# Altium PCB PCB1_1.pcbdoc
Units mil, origin at the board's own origin, x right, y up, seen from the top; angles counter-clockwise.
Board outline 2365 x 1975 mil, 4 copper layers (Top Layer, Signal-1, Inner2, Bottom Layer), stack 62.447 mil thick; 81 components, 55 nets, 340 pads, 136 vias.
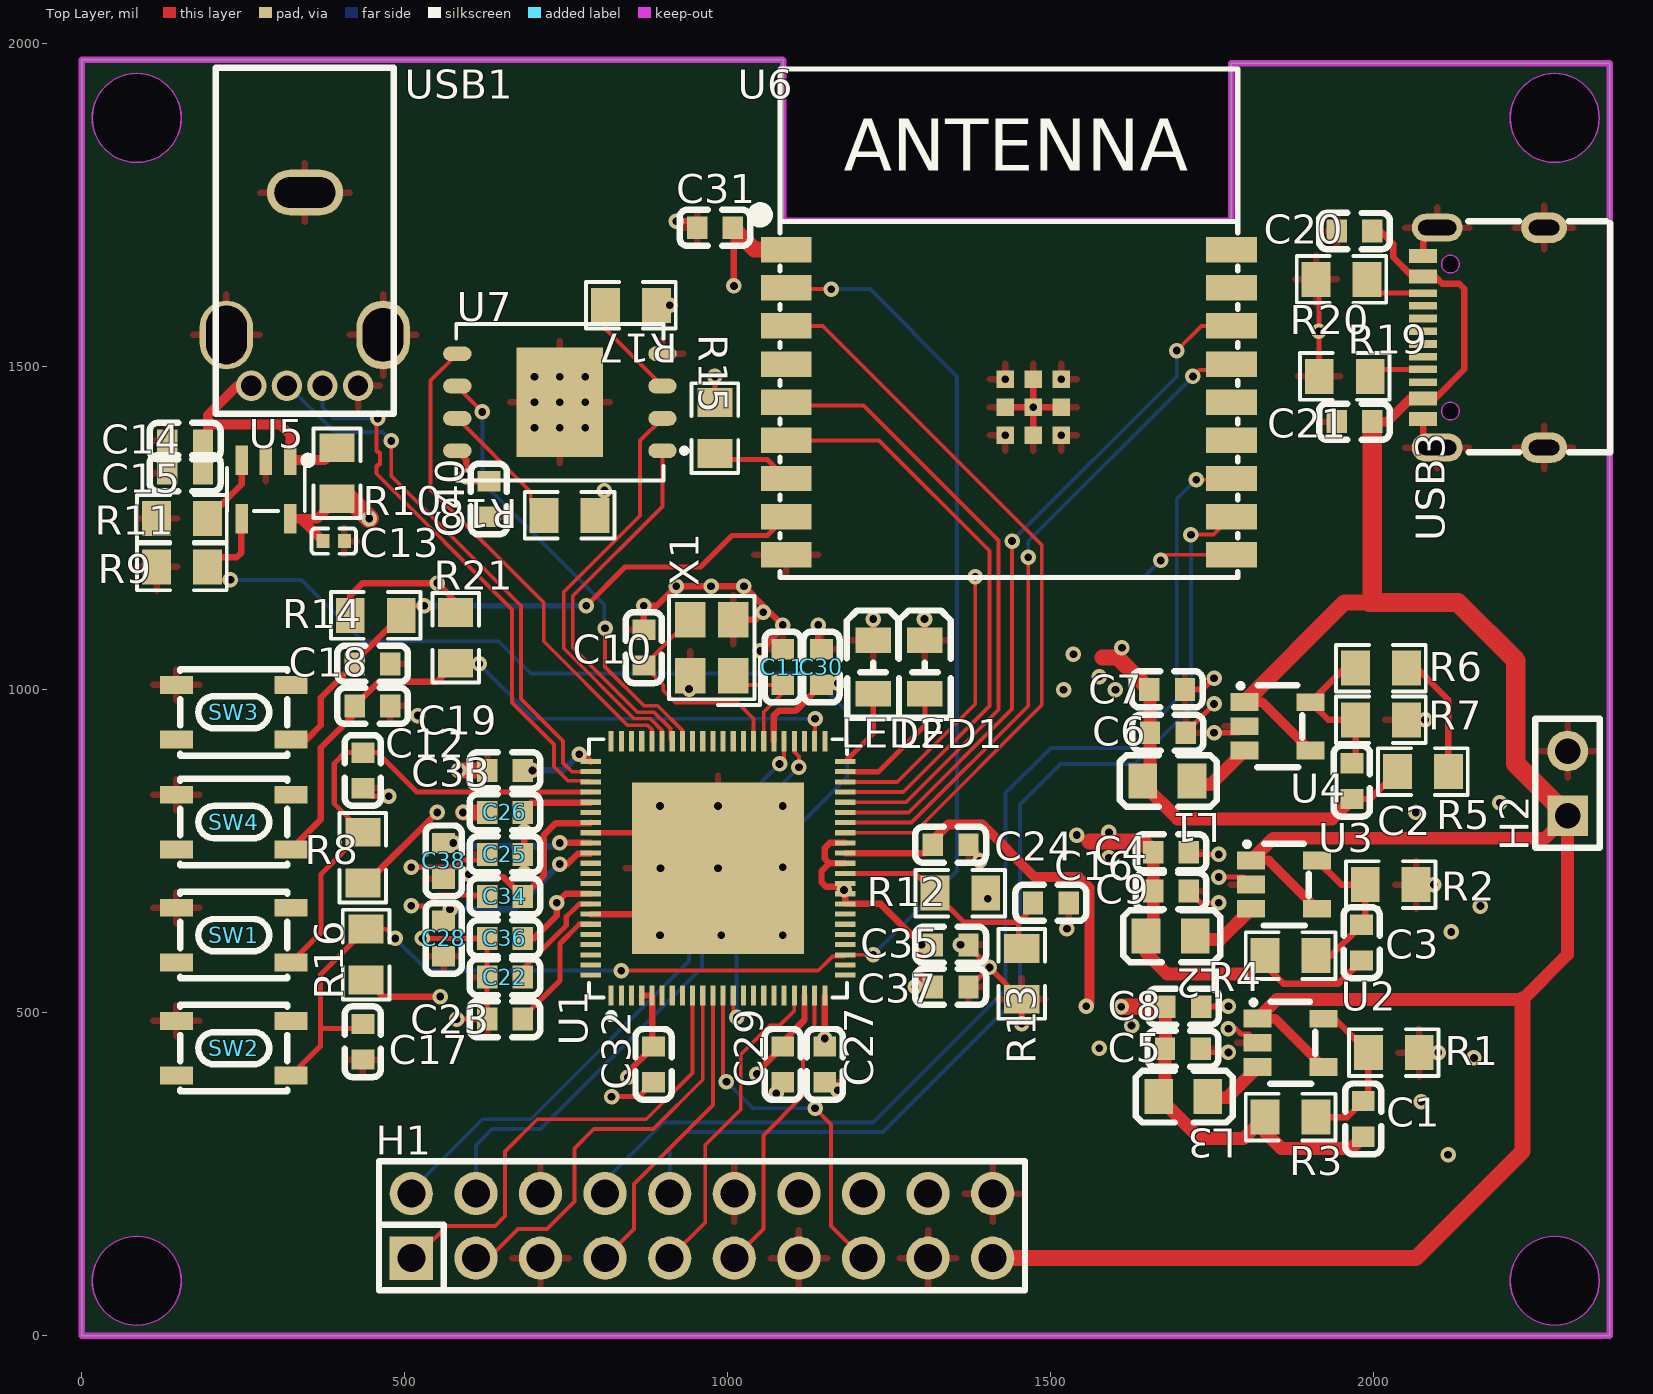
[diagram p0: Top Layer view]
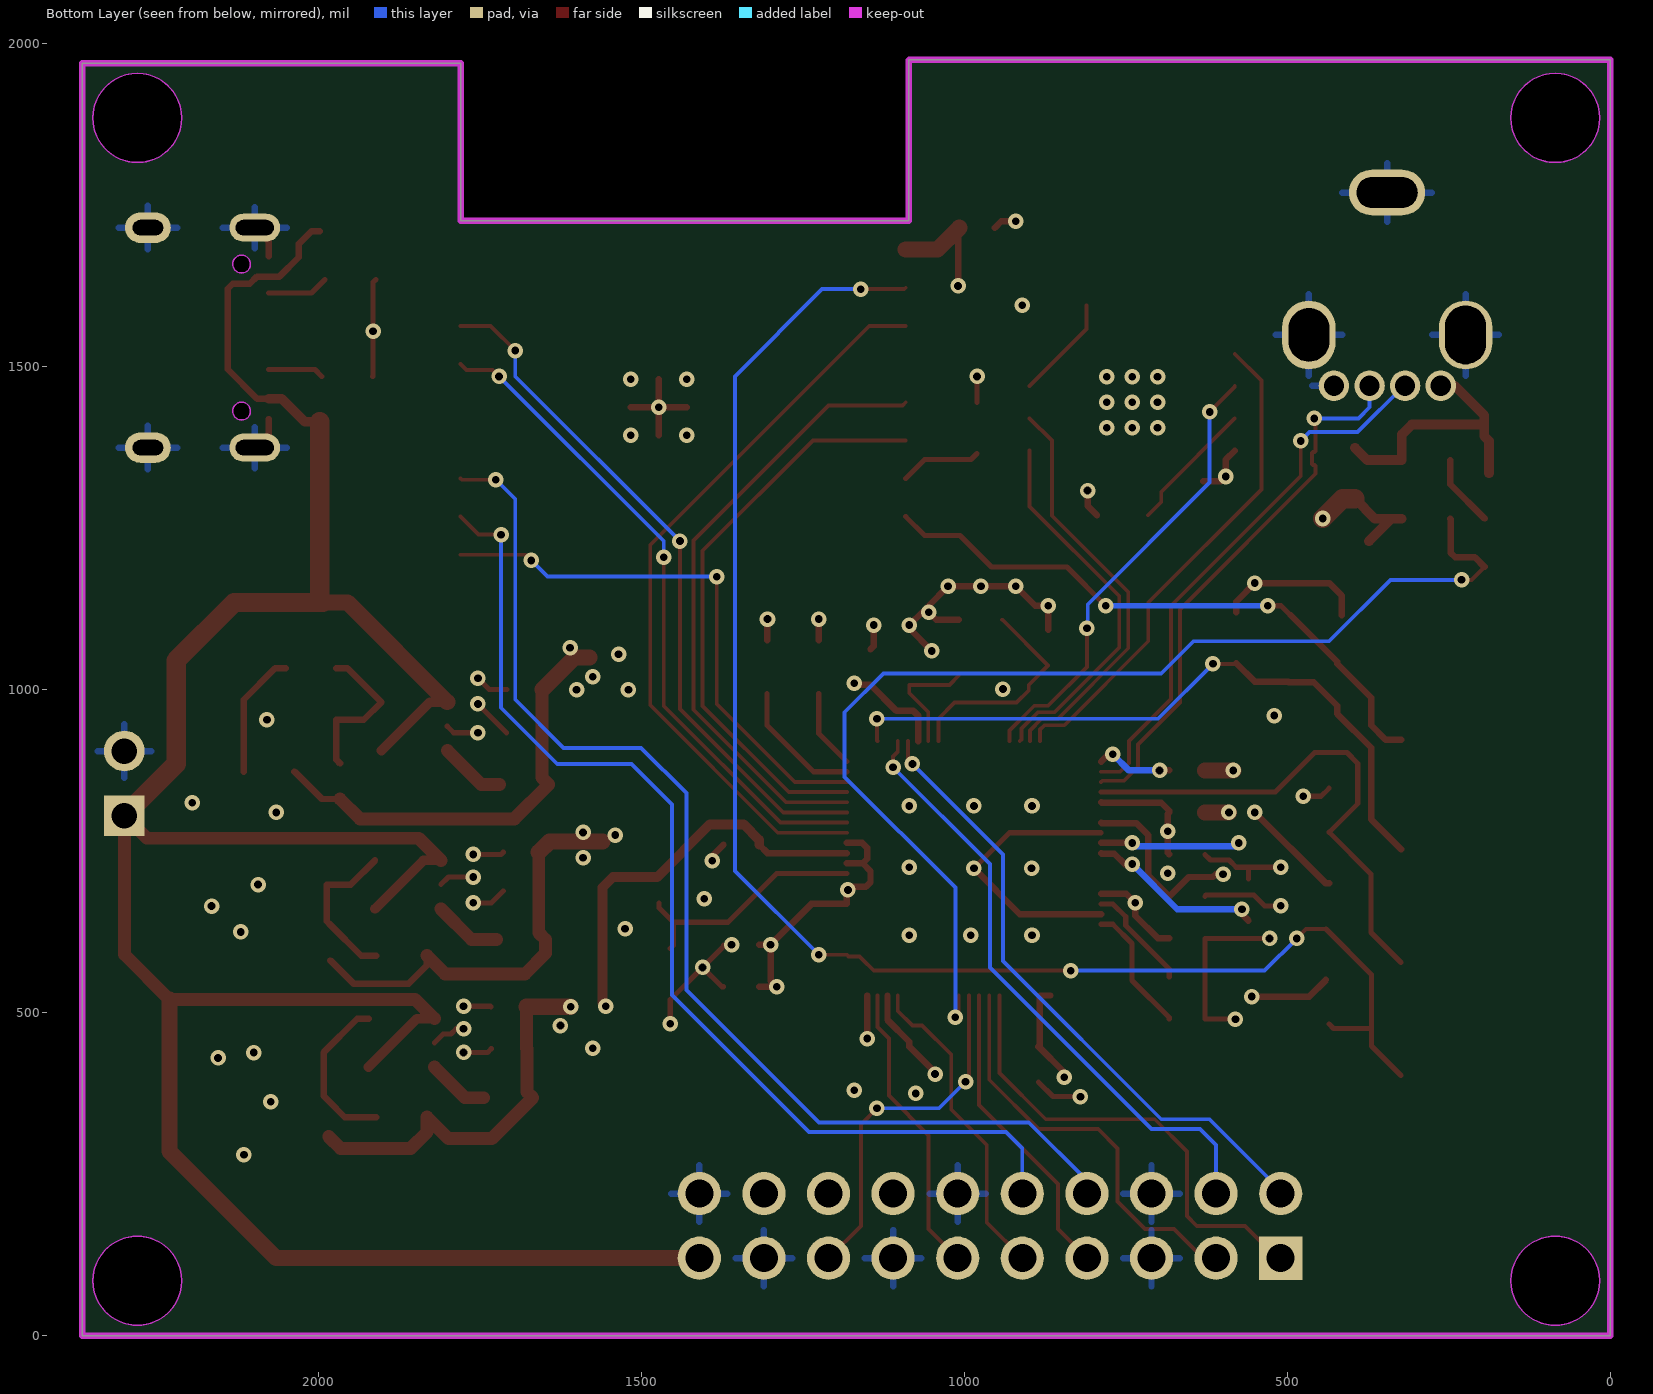
[diagram p1: Bottom Layer view, seen from below]
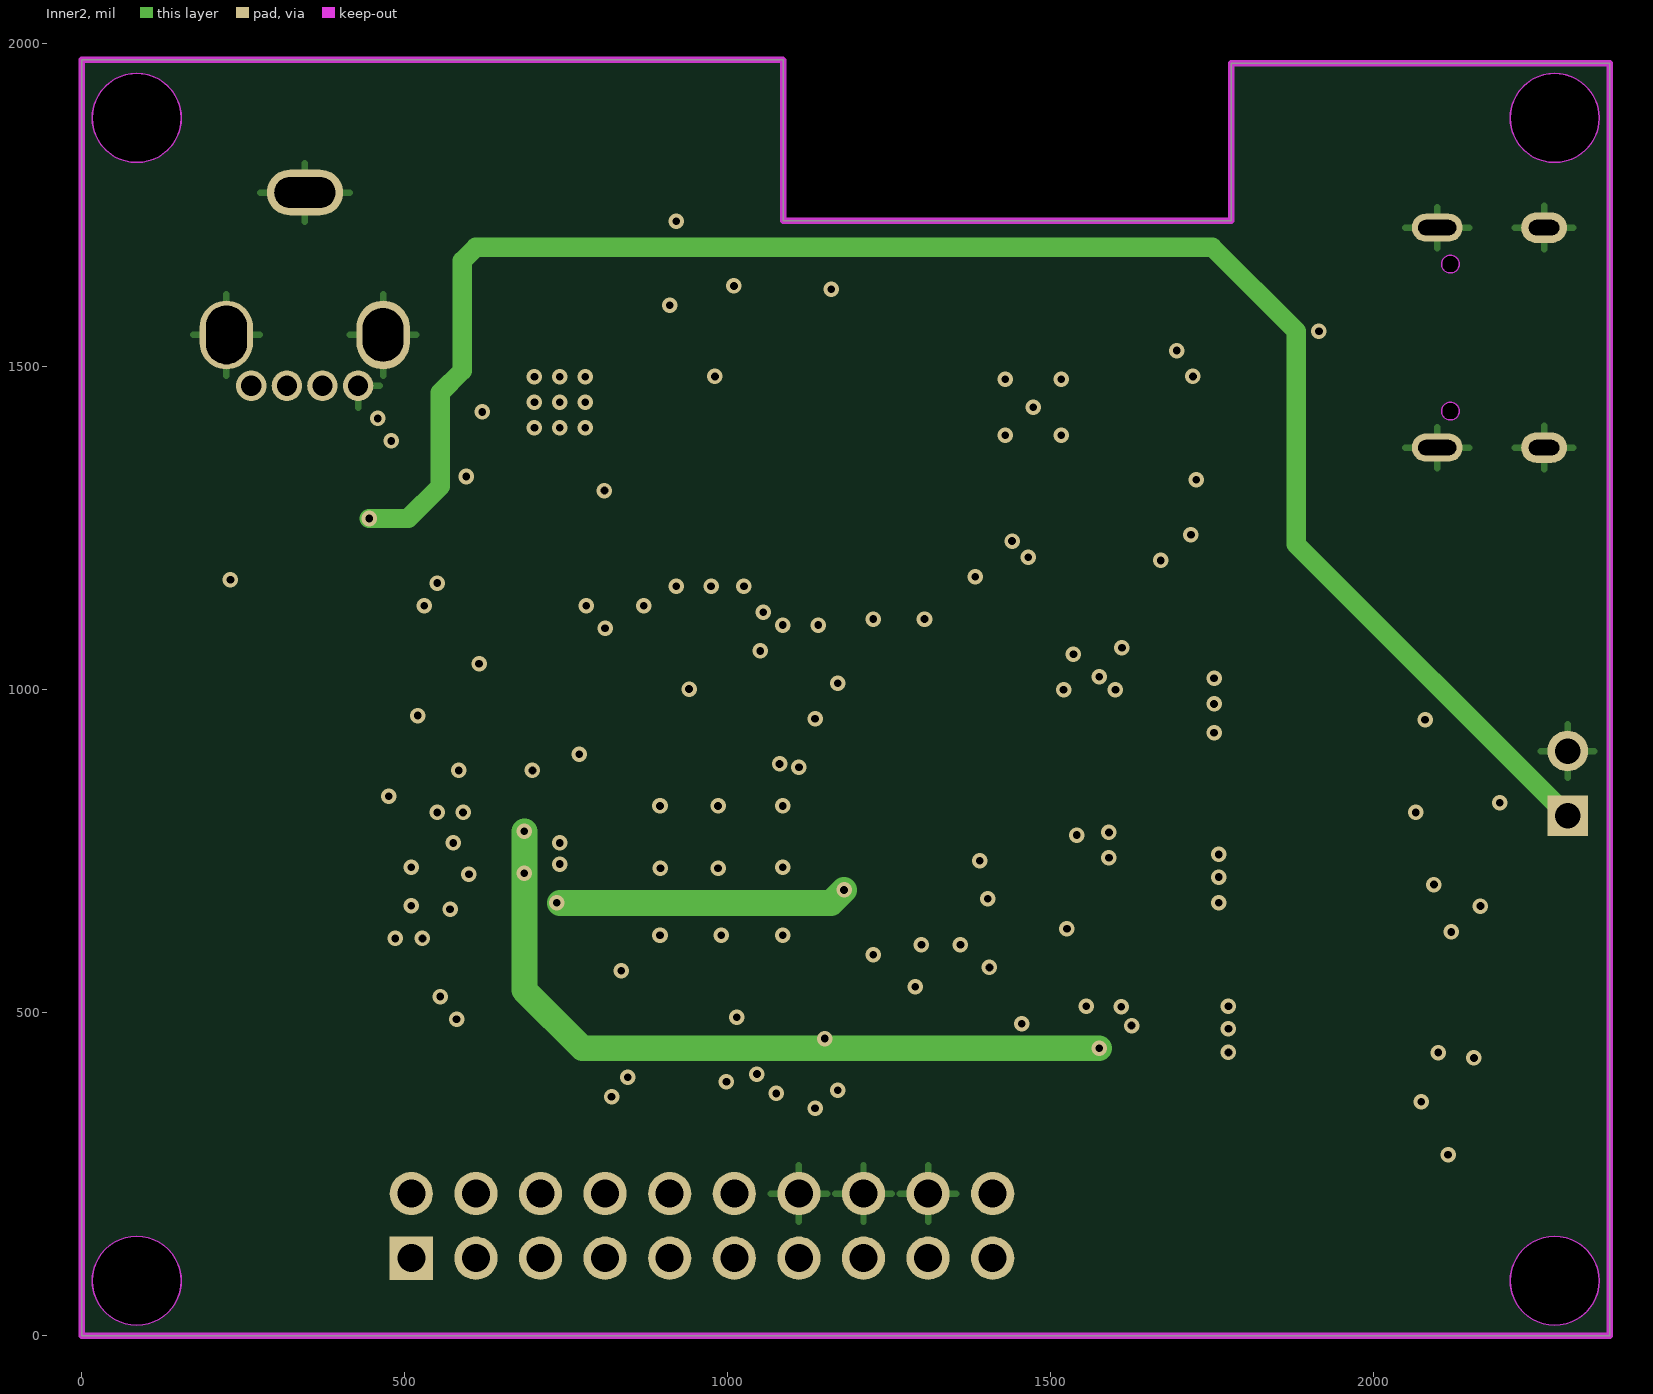
[diagram p2: Inner2]

## Layer stack, top to bottom
Top Layer: signal copper 1.378
Dielectric1: surface 8.283, 7628 RC49% 8.6mil, Dk 0
Signal-1: signal copper 0.598
Dielectric2: surface 41.929, 1.1mm H/HOZ Copper, Dk 0
Inner2: signal copper 0.598
Dielectric3: surface 8.283, 7628 RC49% 8.6mil, Dk 0
Bottom Layer: signal copper 1.378

## Board outline
0,1975 1085,1975 1085.67,1974.33 1085.67,1725.67 1779.33,1725.67 1779.33,1970 2365,1970 2365,0 0,0
cut-out: 153.9,1885 cw(c85,1885) 16.1,1885 cw(c85,1885)
cut-out: 2348.9,1885 cw(c2280,1885) 2211.1,1885 cw(c2280,1885)
cut-out: 153.9,85 cw(c85,85) 16.1,85 cw(c85,85)
cut-out: 2348.9,85 cw(c2280,85) 2211.1,85 cw(c2280,85)

## Design rules (kind name [scope] priority, off if disabled: settings)
BoardOutlineClearance copperThickness2oz_1 [All] p2 off: genericclearance=7.99 ignorepadtopadclearanceinfootprint=FALSE except(0: Arc-SplitContinuation Track-SplitContinuation SMDPad-SplitContinuation THPad-SplitContinuation Via-SplitContinuation Fill-SplitContinuation Region-SplitContinuation Poly-SplitContinuation Text-SplitContinuation Hole-SplitContinuation; 5.98: Arc-CutoutEdge SMDPad-CutoutEdge THPad-CutoutEdge Via-CutoutEdge Fill-CutoutEdge Region-CutoutEdge Text-CutoutEdge; 6.93: Hole-OutlineEdge Hole-CutoutEdge; 10: Poly-OutlineEdge Poly-CutoutEdge; 11.81: Arc-OutlineEdge Track-OutlineEdge SMDPad-OutlineEdge THPad-OutlineEdge Via-OutlineEdge Fill-OutlineEdge Region-OutlineEdge Text-OutlineEdge Track-CutoutEdge)
BoardOutlineClearance copperThickness1oz_1 [All] p4: genericclearance=4.02 ignorepadtopadclearanceinfootprint=FALSE except(0: Arc-SplitContinuation Track-SplitContinuation SMDPad-SplitContinuation THPad-SplitContinuation Via-SplitContinuation Fill-SplitContinuation Region-SplitContinuation Poly-SplitContinuation Text-SplitContinuation Hole-SplitContinuation; 5.98: SMDPad-CutoutEdge THPad-CutoutEdge Via-CutoutEdge Fill-CutoutEdge Region-CutoutEdge Text-CutoutEdge; 6.93: Hole-OutlineEdge Hole-CutoutEdge; 10: Poly-OutlineEdge Poly-CutoutEdge; 11.81: Arc-OutlineEdge Track-OutlineEdge SMDPad-OutlineEdge THPad-OutlineEdge Via-OutlineEdge Fill-OutlineEdge Region-OutlineEdge Text-OutlineEdge Arc-CutoutEdge Track-CutoutEdge)
Clearance copperThickness2oz [All] p1 off: gap=7.99 ignorepadtopadclearanceinfootprint=FALSE except(5.98: SMDPad-Track SMDPad-SMDPad THPad-Track SMDPad-THPad THPad-THPad Track-Via SMDPad-Via THPad-Via Via-Via Fill-Track Region-Track Fill-SMDPad Region-SMDPad Fill-THPad Region-THPad Fill-Via Region-Via Fill-Fill Fill-Region Region-Region Arc-Track Arc-SMDPad Arc-THPad Arc-Via Fill-Arc Region-Arc Arc-Arc Text-Track SMDPad-Text Text-THPad Text-Via Fill-Text Region-Text Arc-Text Text-Text; 6.93: Hole-Track Hole-SMDPad Hole-THPad Hole-Via Fill-Hole Region-Hole Hole-Arc Hole-Text; 10: Poly-Track Poly-SMDPad Poly-THPad Poly-Via Poly-Fill Poly-Region Poly-Poly Poly-Arc Poly-Text Poly-Hole)
Clearance copperThickness1oz [All] p3: gap=4.02 ignorepadtopadclearanceinfootprint=FALSE except(5.98: SMDPad-Track SMDPad-SMDPad THPad-Track SMDPad-THPad THPad-THPad Track-Via SMDPad-Via THPad-Via Via-Via Fill-Track Region-Track Fill-SMDPad Region-SMDPad Fill-THPad Region-THPad Fill-Via Region-Via Fill-Fill Fill-Region Region-Region Arc-Track Arc-SMDPad Arc-THPad Arc-Via Fill-Arc Region-Arc Arc-Arc Text-Track SMDPad-Text Text-THPad Text-Via Fill-Text Region-Text Arc-Text Text-Text; 6.93: Hole-Track Hole-SMDPad Hole-THPad Hole-Via Fill-Hole Region-Hole Hole-Arc Hole-Text; 10: Poly-Track Poly-SMDPad Poly-THPad Poly-Via Poly-Fill Poly-Region Poly-Poly Poly-Arc Poly-Text Poly-Hole)
DiffPairsRouting differentialPair [All] p1: maxlimit=8 minlimit=6 mostfreqgap=6 toplayer_minwidth=5 toplayer_prefwidth=6 toplayer_maxwidth=100 toplayer_mingap=8 toplayer_prefgap=8 toplayer_maxgap=8 midlayer1_minwidth=5 midlayer1_prefwidth=6 midlayer1_maxwidth=100 midlayer1_mingap=8 midlayer1_prefgap=8 midlayer1_maxgap=8 midlayer2_minwidth=5 midlayer2_prefwidth=6 midlayer2_maxwidth=100 midlayer2_mingap=8 midlayer2_prefgap=8 midlayer2_maxgap=8 bottomlayer_minwidth=5 bottomlayer_prefwidth=6 bottomlayer_maxwidth=100 bottomlayer_mingap=8 bottomlayer_prefgap=8 bottomlayer_maxgap=8 maxuncoupledlength=10
HoleToHoleClearance otherClearance [All] p1: gap=11.81 allowstackedmicrovias=TRUE
Length netLength [All] p1: minlimit=0 maxlimit=0
MatchedLengths netLengthTolerance [All] p1: tolerance=1000
PasteMaskExpansion pasteMaskExpansion [All] p1: expansion=0
PlaneConnect innerPlane [All] p1: planeconnectstyle=Relief reliefexpansion=20 reliefentries=4 reliefconductorwidth=10 reliefairgap=10
PolygonConnect copperRegion [(InNet('GND'))] p1: connectstyle=Relief reliefconductorwidth=10 reliefentries=4 polygonreliefangle="90 Angle" airgapwidth=10 via.connectstyle=Relief via.reliefconductorwidth=10 via.reliefentries=4 via.polygonreliefangle="90 Angle" via.airgapwidth=10
RoutingVias viaSize [All] p1: holewidth=12.01 width=24.02 viastyle="Through Hole" minholewidth=11.81 minwidth=19.68 maxholewidth=248.03 maxwidth=393.7
SolderMaskExpansion solderMaskExpansion [IsVia] p1: expansion=-1000 istentingtop=TRUE
SolderMaskExpansion solderMaskExpansion [All] p2: expansion=2 istentingtop=FALSE
Width copperThickness2oz_2 [All] p1 off: maxlimit=10 minlimit=10 preferedwidth=10 toplayer_minwidth=8 toplayer_maxwidth=100 toplayer_prefwidth=10 midlayer1_minwidth=8 midlayer1_maxwidth=100 midlayer1_prefwidth=10 midlayer2_minwidth=8 midlayer2_maxwidth=100 midlayer2_prefwidth=10 bottomlayer_minwidth=8 bottomlayer_maxwidth=100 bottomlayer_prefwidth=10
Width copperThickness1oz_2 [All] p2: maxlimit=10 minlimit=10 preferedwidth=10 toplayer_minwidth=5 toplayer_maxwidth=100 toplayer_prefwidth=10 midlayer1_minwidth=5 midlayer1_maxwidth=100 midlayer1_prefwidth=10 midlayer2_minwidth=5 midlayer2_maxwidth=100 midlayer2_prefwidth=10 bottomlayer_minwidth=5 bottomlayer_maxwidth=100 bottomlayer_prefwidth=10

## Components (designator, comment, footprint, x,y, rotation, side; value= is the part's Value field where it differs from the comment)
C1 "220pF" C0603 1983.64,335.62 r270 top
C2 "220pF" C0603 1966.08,858.3 r270 top
C3 "220pF" C0603 1981.08,608.3 r270 top
C4 "10uF" C0603 1686.08,748.3 r0 top
C5 "10uF" C0603 1704.41,444.21 r0 top
C6 "10uF" C0603 1681.08,933.3 r0 top
C7 "100nF" C0603 1680.16,1000.46 r180 top
C8 "100nF" C0603 1705.16,509.21 r180 top
C9 "100nF" C0603 1686.08,688.3 r180 top
C10 "22pF" C0603 870,1065 r90 top
C11 "22pF" C0603 1085,1035 r90 top
C12 "100nF" C0603 435,875 r90 top
C13 "1uF" C0402 390,1230 r180 top
C14 "10uF" C0603 160,1385 r180 top
C15 "100nF" C0603 160,1335 r180 top
C16 "100nF" C0603 1500,670 r180 top
C17 "100nF" C0603 435,455 r90 top
C18 "100nF" C0603 450,1040 r180 top
C19 "100nF" C0603 450,975 r180 top
C20 "100nF" C0603 1970,1710 r180 top
C21 "22uF" C0603 1970,1415 r180 top
C22 "1uF" C0603 655,555 r0 top
C23 "1uF" C0603 655,490 r0 top
C24 "10uF" C0603 1345,760 r180 top
C25 "100nF" C0603 655,745 r0 top
C26 "100nF" C0603 655,810 r0 top
C27 "100nF" C0603 1150,420 r90 top
C28 "10uF" C0603 560,615 r270 top
C29 "10uF" C0603 1085,420 r90 top
C30 "100nF" C0603 1145,1035 r270 top
C31 "100nF" C0603 980,1715 r0 top
C32 "100nF" C0603 885,420 r90 top
C33 "100nF" C0603 655,875 r0 top
C34 "100nF" C0603 655,680 r0 top
C35 "100nF" C0603 1345,605 r180 top
C36 "10uF" C0603 655,615 r0 top
C37 "1uF" C0603 1345,540 r180 top
C38 "10uF" C0603 560,735 r270 top
C40 "100nF" C0603 630,1295 r90 top
H1 "HX PZ2.54-2x10P ZZ" HDR-TH_20P-P2.54-V-M-R2-C10-S2.54 960,170 r0 top
H2 "LAIL-PZ2.54-2P-L" CONN-TH_LAIL-PZ2.54-2P-L 2300,855 r90 top
L1 "1.5uH" L0805 1680.4,858.68 r180 top
L2 "1.5uH" L0805 1685.4,618.37 r180 top
L3 "1.5uH" L0805 1705,370 r180 top
LED1 "GL0805UR01" LED0805-R-RD_RED 1305,1035 r270 top
LED2 "GL0805UR01" LED0805-R-RD_RED 1225,1035 r270 top
R1 "100kΩ" R0805 2031.08,438.3 r180 top
R2 "100kΩ" R0805 2026.08,698.3 r0 top
R3 "82.5kΩ" R0805 1871.08,338.3 r180 top
R4 "330kΩ" R0805 1871.08,588.3 r180 top
R5 "430kΩ" R0805 2076.08,873.3 r180 top
R6 "22kΩ" R0805 2011.08,1033.3 r0 top
R7 "100kΩ" R0805 2011.08,953.3 r0 top
R8 "3KΩ" R0805 435,740 r90 top
R9 "100kΩ" R0805 155,1190 r0 top
R10 "NC-0Ω" R0805 395,1335 r90 top
R11 "6.8kΩ" R0805 155,1265 r0 top
R12 "2kΩ" R0805 1360,685 r0 top
R13 "2kΩ" R0805 1455,560 r90 top
R14 "3KΩ" R0805 455,1115 r0 top
R15 "10kΩ" R0805 980,1405 r270 top
R16 "3KΩ" R0805 440,590 r90 top
R17 "10kΩ" R0805 850,1595 r180 top
R18 "10kΩ" R0805 755,1270 r0 top
R19 "5.1kΩ" R0805 1955,1485 r0 top
R20 "5.1kΩ" R0805 1950,1635 r0 top
R21 "3KΩ" R0805 578.71,1080.28 r270 top
SW1 "TS-KG89S-AT25F" SW-SMD_4P-L4.2-W3.3-P2.15-LS5.1 235,620 r180 top
SW2 "TS-KG89S-AT25F" SW-SMD_4P-L4.2-W3.3-P2.15-LS5.1 235,445 r180 top
SW3 "TS-KG89S-AT25F" SW-SMD_4P-L4.2-W3.3-P2.15-LS5.1 235,965 r180 top
SW4 "TS-KG89S-AT25F" SW-SMD_4P-L4.2-W3.3-P2.15-LS5.1 235,795 r180 top
U1 "F1C200S" QFN-88_L10.0-W10.0-P0.40-BL-EP6.75 984.8,723.44 r0 top
U2 "SY8089A1AAC" TSOT-23-5_L2.9-W1.6-P0.95-LS2.8-BR 1871.08,453.3 r180 top
U3 "SY8089A1AAC" TSOT-23-5_L2.9-W1.6-P0.95-LS2.8-BR 1861.08,698.3 r180 top
U4 "SY8089A1AAC" TSOT-23-5_L2.9-W1.6-P0.95-LS2.8-BR 1851.08,943.3 r180 top
U5 "SY6280AAC" SOT-23-5_L3.0-W1.7-P0.95-LS2.8-BL 285,1310 r180 top
U6 "2.4GHz" BULETM-SMD_ESPRESSIF_ESP32-C3-WROOM-02-N4-4MB 1435,1445 r0 top
U7 "W25N01GVZEIG" WSON-8_L8.0-W6.10-P1.27-TL-EP 740,1445 r180 top
USB1 "906-162A1011D10200" USB-A-TH_4P-P1.40-V-F-C39416 345,1620 r180 top
USB3 "TYPE-C 16PIN 2MD(073)" USB-C-SMD_TYPE-C-16PIN-2MD-073 2170,1545 r90 top
X1 "24MHz" CRYSTAL-SMD_4P-L3.2-W2.5-BL 975,1065 r90 top

## Footprints (in the part's own frame and the unit in brackets; to place one, negate y for a bottom-side part, rotate by r counter-clockwise, add the part's x,y. Pads: shape width x height; smd on the part's side, far side on the other; paste and mask are expansions set on the pad)
BULETM-SMD_ESPRESSIF_ESP32-C3-WROOM-02-N4-4MB [mm]
  rect 2x1 smd paste+0 mask+0.05: 1(-8.75,6) 2(-8.75,4.5) 3(-8.75,3) 4(-8.75,1.5) 5(-8.75,0) 6(-8.75,-1.5) 7(-8.75,-3) 8(-8.75,-4.5) 9(-8.75,-6) 10(8.75,-6) 11(8.75,-4.5) 12(8.75,-3) 13(8.75,-1.5) 14(8.75,0) 15(8.75,1.5) 16(8.75,3) 17(8.75,4.5) 18(8.75,6)
  rect 0.7x0.7 smd paste+0 mask+0.05: 19(-0.14,-1.3) 19(-0.14,-0.2) 19(-0.14,0.9) 19(0.96,-1.3) 19(0.96,-0.2) 19(0.96,0.9) 19(2.06,-1.3) 19(2.06,-0.2) 19(2.06,0.9)
  silkscreen extent -10.03,-6.9 9,13.1
C0402 [mm]
  rect 0.5x0.54 smd: 1(-0.42,0) 2(0.42,0)
  silkscreen extent -0.87,-0.5 0.87,0.5
C0603 [mm]
  rect 0.8x0.9 smd: 1(-0.7,0) 2(0.7,0)
  silkscreen extent -1.39,-0.71 1.39,0.71
CONN-TH_LAIL-PZ2.54-2P-L [mm]
  rect 1.6x1.6 hole 1 paste+0 mask+0.05: 1(-1.27,0)
  round 1.6 hole 1 paste+0 mask+0.05: 2(1.27,0)
  silkscreen extent -2.54,-1.27 2.54,1.27
CRYSTAL-SMD_4P-L3.2-W2.5-BL [mm]
  rect 1.4x1.2 smd: 1(-1.1,-0.85) 2(1.1,-0.85) 3(1.1,0.85) 4(-1.1,0.85)
  silkscreen extent -2.26,-1.91 2.03,1.68
HDR-TH_20P-P2.54-V-M-R2-C10-S2.54 [mm]
  rect 1.7x1.7 hole 1.1: 1(-11.43,-1.27)
  round 1.7 hole 1.1: 2(-11.43,1.27) 3(-8.89,-1.27) 4(-8.89,1.27) 5(-6.35,-1.27) 6(-6.35,1.27) 7(-3.81,-1.27) 8(-3.81,1.27) 9(-1.27,-1.27) 10(-1.27,1.27) 11(1.27,-1.27) 12(1.27,1.27) 13(3.81,-1.27) 14(3.81,1.27) 15(6.35,-1.27) 16(6.35,1.27) 17(8.89,-1.27) 18(8.89,1.27) 19(11.43,-1.27) 20(11.43,1.27)
  silkscreen extent -12.7,-2.54 12.7,2.54
L0805 [mil]
  rect 44.59x54.21 smd paste-3937.01 mask+2: 1(-38.04,0) 2(38.04,0)
  silkscreen extent -77,-40 73,40
LED0805-R-RD_RED [mm]
  rect 1x1.4 smd: 1(1.05,0) 2(-1.05,0)
  silkscreen extent -2.22,-1.04 1.99,1.01
QFN-88_L10.0-W10.0-P0.40-BL-EP6.75 [mm]
  rect 0.2x0.8 smd paste-100 mask+0.051: 1(-4.2,-5) 2(-3.8,-5) 3(-3.4,-5) 4(-3,-5) 5(-2.6,-5) 6(-2.2,-5) 7(-1.8,-5) 8(-1.4,-5) 9(-1,-5) 10(-0.6,-5) 11(-0.2,-5) 12(0.2,-5) 13(0.6,-5) 14(1,-5) 15(1.4,-5) 16(1.8,-5) 17(2.2,-5) 18(2.6,-5) 19(3,-5) 20(3.4,-5) 21(3.8,-5) 22(4.2,-5) 45(4.2,5) 46(3.8,5) 47(3.4,5) 48(3,5) 49(2.6,5) 50(2.2,5) 51(1.8,5) 52(1.4,5) 53(1,5) 54(0.6,5) 55(0.2,5) 56(-0.2,5) 57(-0.6,5) 58(-1,5) 59(-1.4,5) 60(-1.8,5) 61(-2.2,5) 62(-2.6,5) 63(-3,5) 64(-3.4,5) 65(-3.8,5) 66(-4.2,5)
  rect 0.8x0.2 smd paste-100 mask+0.051: 23(5,-4.2) 24(5,-3.8) 25(5,-3.4) 26(5,-3) 27(5,-2.6) 28(5,-2.2) 29(5,-1.8) 30(5,-1.4) 31(5,-1) 32(5,-0.6) 33(5,-0.2) 34(5,0.2) 35(5,0.6) 36(5,1) 37(5,1.4) 38(5,1.8) 39(5,2.2) 40(5,2.6) 41(5,3) 42(5,3.4) 43(5,3.8) 44(5,4.2) 67(-5,4.2) 68(-5,3.8) 69(-5,3.4) 70(-5,3) 71(-5,2.6) 72(-5,2.2) 73(-5,1.8) 74(-5,1.4) 75(-5,1) 76(-5,0.6) 77(-5,0.2) 78(-5,-0.2) 79(-5,-0.6) 80(-5,-1) 81(-5,-1.4) 82(-5,-1.8) 83(-5,-2.2) 84(-5,-2.6) 85(-5,-3) 86(-5,-3.4) 87(-5,-3.8) 88(-5,-4.2)
  rect 6.75x6.75 smd paste-100 mask+0.051: 89(0,0)
  silkscreen extent -5.08,-5.93 5.08,5.08
R0805 [mm]
  rect 1.133x1.377 smd paste-100 mask+0.051: 1(-1,0) 2(1,0)
  silkscreen extent -1.76,-0.92 1.76,0.92
SOT-23-5_L3.0-W1.7-P0.95-LS2.8-BL [mm]
  rect 0.49x1.157 smd: 1(-0.95,-1.154) 2(0,-1.154) 3(0.95,-1.154)
  rect 0.49x1.175 smd: 4(0.95,1.154) 5(-0.95,1.154)
  silkscreen extent -1.8,-1.29 1.53,0.85
SW-SMD_4P-L4.2-W3.3-P2.15-LS5.1 [mm]
  rect 1.3x0.7 smd: 1(-2.25,1.075) 2(2.25,1.075) 3(-2.25,-1.075) 4(2.25,-1.075)
  silkscreen extent -2.1,-1.7 2.1,1.7
TSOT-23-5_L2.9-W1.6-P0.95-LS2.8-BR [mm]
  rect 1.1x0.7 smd: 1(1.294,-0.951) 2(1.294,-0.001) 3(1.294,0.951) 4(-1.294,0.951) 5(-1.294,-0.949)
  silkscreen extent -0.97,-1.65 1.52,1.61
USB-A-TH_4P-P1.40-V-F-C39416 [mm]
  round 1.2 hole 0.8: 1(2.098,3.8) 2(0.698,3.8) 3(-0.699,3.8) 4(-2.098,3.8)
  oval 2.1x2.7 hole 1.6 slot 2.1 at 90 deg copper offset -0.001,0.001: 5(-3.08,1.8)
  oval 2.1x2.7 hole 1.6 slot 2.3 at 90 deg copper offset 0.001,0.001: 6(3.08,1.8)
  oval 3x1.8 hole 1.2 slot 2.4 at 0 deg: 7(-0.01,-3.8)
  silkscreen extent -3.5,-8.7 3.5,4.9
USB-C-SMD_TYPE-C-16PIN-2MD-073 [mm]
  oval 1.2x1.8 hole 0.6 slot 1.2 at 90 deg paste+0 mask+0.05: 13(-4.325,-2.375) 14(4.325,-2.375)
  oval 1.1x2 hole 0.6 slot 1.5 at 90 deg paste+0 mask+0.05: 13(-4.325,1.825) 14(4.325,1.825)
  rect 0.55x1.1 smd paste+0 mask+0.05: A1B12(-3.2,2.375) A4B9(-2.4,2.375) B1A12(3.2,2.375) B4A9(2.4,2.375)
  rect 0.3x1.1 smd paste+0 mask+0.05: A5(-1.25,2.375) A6(-0.25,2.375) A7(0.25,2.375) A8(1.25,2.375) B5(1.75,2.375) B6(0.75,2.375) B7(-0.75,2.375) B8(-1.75,2.375)
  Board Outline Layer circle w0.003: c-2.89,1.305 r0.35
  Board Outline Layer circle w0.003: c2.89,1.305 r0.35
  Board Outline Layer region: -2.89,0.955 -3.042,0.99 -3.164,1.087 -3.231,1.227 -3.231,1.383 -3.164,1.523 -3.042,1.62 -2.89,1.655 -2.89,1.655 -2.738,1.62 -2.616,1.523 -2.549,1.383 -2.549,1.227 -2.616,1.087 -2.738,0.99 -2.89,0.955
  Board Outline Layer region: -2.89,0.955 -2.968,0.964 -3.042,0.99 -3.108,1.031 -3.164,1.087 -3.205,1.153 -3.231,1.227 -3.24,1.305 -3.231,1.383 -3.205,1.457 -3.164,1.523 -3.108,1.579 -3.042,1.62 -2.968,1.646 -2.89,1.655 -2.812,1.646 -2.738,1.62 -2.672,1.579 -2.616,1.523 -2.575,1.457 -2.549,1.383 -2.54,1.305 -2.549,1.227 -2.575,1.153 -2.616,1.087 -2.672,1.031 -2.738,0.99 -2.812,0.964
  Board Outline Layer region: 2.89,0.955 2.738,0.99 2.616,1.087 2.549,1.227 2.549,1.383 2.616,1.523 2.738,1.62 2.89,1.655 2.89,1.655 3.042,1.62 3.164,1.523 3.231,1.383 3.231,1.227 3.164,1.087 3.042,0.99 2.89,0.955
  Board Outline Layer region: 2.89,0.955 2.812,0.964 2.738,0.99 2.672,1.031 2.616,1.087 2.575,1.153 2.549,1.227 2.54,1.305 2.549,1.383 2.575,1.457 2.616,1.523 2.672,1.579 2.738,1.62 2.812,1.646 2.89,1.655 2.968,1.646 3.042,1.62 3.108,1.579 3.164,1.523 3.205,1.457 3.231,1.383 3.24,1.305 3.231,1.227 3.205,1.153 3.164,1.087 3.108,1.031 3.042,0.99 2.968,0.964
  Multi-Layer board cut-out: -2.89,0.955 -3.042,0.99 -3.164,1.087 -3.231,1.227 -3.231,1.383 -3.164,1.523 -3.042,1.62 -2.89,1.655 -2.89,1.655 -2.738,1.62 -2.616,1.523 -2.549,1.383 -2.549,1.227 -2.616,1.087 -2.738,0.99 -2.89,0.955
  Multi-Layer board cut-out: 2.89,0.955 2.738,0.99 2.616,1.087 2.549,1.227 2.549,1.383 2.616,1.523 2.738,1.62 2.89,1.655 2.89,1.655 3.042,1.62 3.164,1.523 3.231,1.383 3.231,1.227 3.164,1.087 3.042,0.99 2.89,0.955
  silkscreen extent -4.5,-4.97 4.57,0.6
WSON-8_L8.0-W6.10-P1.27-TL-EP [mm]
  oval 1.115x0.581 smd: 1(-4.033,1.905) 2(-4.033,0.635) 3(-4.033,-0.635) 4(-4.033,-1.905) 5(4.033,-1.905) 6(4.033,-0.635) 7(4.033,0.635) 8(4.033,1.905)
  rect 3.4x4.3 smd: 9(0,0)
  silkscreen extent -4.99,-3.08 4.08,3.08

## Via types
v1: diameter 24, hole 12, Top Layer to Bottom Layer, 72 vias
v2: diameter 24.02, hole 12, Top Layer to Bottom Layer, 64 vias

## Nets (pads, with @x,y where several pads share a name; then routed paths per layer and width w, separated by ;. In a path a pad name is that pad's centre, name@x,y a point inside that pad or via, vN(x,y) a via of type N, cw(c..) or ccw(c..) an arc to the next point about the centre after c; other vN are vias at no path point)
1.1V: C1.2 C5.1 C8.2 C24.2 C25.2 C26.2 C27.2 L3.2 R3.2 U1.22 U1.35 U1.71 | length 2657.5
  Top Layer w10: C25.2 685,747.44 v2(685,780.96) 685,807.56 C26.2 682.56,812.56 694.97,824.97 787.12,824.97 U1.71 ; v2(1150,460) 1150,526.43 U1.22 ; U1.35 1304.5,747.06 C24.2
  Top Layer w15: C24.2 1317.44,767.44 1341.2,791.2 1393.89,791.2 1475.09,710 1543.69,710 1560,693.69 1560,515 v2(1555,510)
  Top Layer w20: C8.2 1677.6,444.96 C5.1 1676.85,377.11 1668.04,368.3 1731.34,305 1798.41,305 R3.2 1831.71,314.99 1856.7,290 1965.58,290 C1.2
  Top Layer w25: v2(1609.21,509.21) C8.2
  Inner2 w40: v2(685,780.96) v2(685,715.71) 685,535 775,445 v2(1575,445)
  other v2: 1625,480
2V5: C3.2 C4.1 C9.2 C35.2 C36.2 C37.2 L2.2 R4.2 R12.2 U1.30 U1.31 U1.32 U1.34 U1.36 U1.80 | length 1693.8
  Top Layer w10: C36.2 700,615 735,650 v2(735,670) 749.07,684.07 U1.80 ; v2(1180,690) 1175,695 1152.07,695 1145,702.07 1145,719.14 1157.16,731.31 ; U1.31 U1.30 1236.45,668.32 v2(1299.77,605) ; U1.34 1157.16,731.31 ; U1.36 1157.81,762.81 1150,755 1150,738.47 1157.16,731.31 ; C37.2 v2(1290.27,540.01) 1299.77,549.5 v2(1299.77,605) ; C35.2 v2(1299.77,605) ; R4.2 1831.71,573.29 1860,545 1945.34,545 C3.2
  Top Layer w20: C4.1 C9.2 1658.52,623.78 1648.04,613.3 1648.04,591.96 1680,560 1803.41,560 R4.2
  Top Layer w25: 1560,765 1641.82,765 C4.1
  Inner2 w40: v2@740,670 1160,670 v2(1180,690)
  other v2: 1402.32,676.34 1590,740 1540,775 1590,779.09
3V3: C2.2 C6.1 C7.2 C29.2 C30.2 C31.2 C32.2 C33.2 C34.2 C40.2 H1.14 H1.16 H1.18 L1.2 R5.2 R8.1 R14.1 R15.1 R16.1 R17.1 R18.2 R21.1 U1.4 U1.5 U1.20 U1.50 U1.67 U1.73 U6.1 U7.8 | length 2438
  Top Layer w8: R15.1 v2(980,1485)
  Top Layer w10: R14.1 415.63,1145.63 435,1165 v1(550,1165) 578.71,1136.29 R21.1 ; R8.1 440.63,700.63 v1(550,810) ; R16.1 465.63,525 v1(555,525) ; U7.8 595,1356.23 v2(595,1330) 602.44,1322.56 C40.2 ; v1(599.29,714.26) 610.74,714.26 615,710 652.56,710 C34.2 715,712.44 715,775 733.48,793.48 787.12,793.48 U1.73 ; C33.2 v2(697.53,875) ; v2(770,900) 776.74,900 U1.67 ; R18.2 808.96,1284.59 v1(808.96,1308.16) ; v2(845,400) 845,407.56 C32.2 883.27,449.29 883.27,525.76 U1.5 U1.4 ; v2(1009.4,1625) C31.2@1009.4,1713.16 ; v2(1045,405) 1045,407.56 C29.2 1085,455 1118.66,488.66 U1.20 ; U1.50 1071.41,960 1078.48,967.07 1104.63,967.07 C30.2 1167.44,1007.44 v1(1170,1010) ; C2.2 1994.15,830.74 R5.2
  Top Layer w20: C7.2@1653.52,999.54 C6.1 1653.52,863.78 1643.04,853.3 1696.34,800 1935.34,800 C2.2
  Top Layer w25: C31.2 1009.4,1713.16 1041.34,1681.22 U6.1 ; 1580,1050 1603.05,1050 C7.2
  Bottom Layer w10: v2(697.53,875) 745,875 v2(770,900)
  other v2: 1519.7,1000 1600,1000 1575,1020 1535,1055 1610,1065 910,1595
$1N25: R5.1 R6.2 | length 196.4
  Top Layer w10: R6.2 2066.7,1033.3 2115.45,984.55 R5.1
$1N102: R11.2 U5.3 | length 112.5
  Top Layer w10: R11.2 247.6,1318.23 U5.3
$1N125: R15.2 U6.7 | length 126.6
  Top Layer w8: R15.2 989.35,1356.28 1061.12,1356.28 U6.7
$1N137: R17.2 U7.3 | length 161.5
  Top Layer w6: R17.2 810.63,1558.14 U7.3
$1N141: R18.1 U7.7 | length 205.7
  Top Layer w6: U7.7 695,1306.23 695,1290.63 R18.1
$1N180: R20.2 USB3.B5 | length 95.9
  Top Layer w8: R20.2 2010.47,1613.9 USB3.B5
$1N181: R19.2 USB3.A5 | length 86.6
  Top Layer w8: R19.2 2005.16,1495.8 USB3.A5
+5V: C13.2 C20.1 C21.1 H1.19 H2.1 R10.1 U2.1 U2.4 U3.1 U3.4 U4.1 U4.4 U5.5 USB3.A4B9 USB3.B4A9 | length 7313.9
  Top Layer w10: C20.1 2010,1710 2030,1690 2030,1669.47 2059.97,1639.49 USB3.B4A9 2094.65,1639.49 2105.95,1628.19 2132.27,1628.19 2140,1620.47 2140,1495.86 2094.65,1450.52 USB3.A4B9
  Top Layer w15: U5.5 338.88,1264.58 ; C13.2 338.88,1264.58 ; R10.1 363.95,1264.58 338.88,1264.58 ; U4.1 1827.14,980.74 U4.4 ; U3.1 1837.14,735.74 U3.4 ; U2.1 1847.14,490.74 U2.4 ; C21.1 2020.93,1415 2056.44,1450.52 USB3.A4B9
  Top Layer w20: U3.1 1844.39,770 2265,770 H2.1 2300,590 2230.43,520.43 1849.82,520.43 U2.1
  Top Layer w25: H1.19 2065,120 2230.43,285.43 2230.43,520.43 ; U4.1 1954.39,1135 1992.56,1135
  Top Layer w30: R10.1 414.37,1295.63 v2(445,1265) ; C21.1 1997.56,1140 1992.56,1135 2130,1135 2220,1045 2220,885 H2.1
  Inner2 w30: v2(445,1265) 505,1265 555,1315 555,1460 588.79,1493.79 588.79,1663.79 610,1685 1750,1685 1880,1555 1880,1225 H2.1
ESP_UART_RX: H1.10 U6.11 | length 1674.3
  Top Layer w6: v2(1716.98,1240) 1751.65,1240 U6.11
  Bottom Layer w6: H1.10 910,290 935,315 1240,315 1452.5,527.5 1452.5,822.5 1515,885 1630,885 1716.98,971.98 v2(1716.98,1240)
ESP_UART_TX: H1.8 U6.12 | length 1800
  Top Layer w6: v2(1725,1325) 1777.6,1325 U6.12
  Bottom Layer w6: H1.8 810,240 900,330 1225,330 1430,535 1430,840 1500,910 1620,910 1695,985 1695,1295 v2(1725,1325)
F4BOOT: H1.15 U1.12 | length 552.9
  Top Layer w6: U1.12 992.67,398.24 v2(997.93,392.99) ; v2(1135,351.98) 1160,326.98 1160,170 H1.15
  Bottom Layer w6: v2(997.93,392.99) 1038.93,351.98 v2(1135,351.98)
F4RESET: H1.7 U1.11 | length 475.7
  Top Layer w6: H1.7 855,165 855,235 976.93,356.93 U1.11
FB1: C1.1 R1.2 R3.1 U2.5 | length 253.3
  Top Layer w10: R3.1 1958.76,338.3 C1.1 1991.71,371.25 R1.2 1939.35,490.66 U2.5
FB2: C3.1 R2.1 R4.1 U3.5 | length 245.3
  Top Layer w10: R4.1 1933.52,588.3 C3.1 1986.71,641.49 R2.1 1949.39,698.3 U3.5
FB3: C2.1 R6.1 R7.1 U4.5 | length 242.3
  Top Layer w10: C2.1 1971.71,891.49 R7.1 1929.39,953.3 U4.5 1954.66,1033.3 R6.1
GND: C4.2 C5.2 C6.2 C7.1 C8.1 C9.1 C10.2 C11.2 C12.1 C13.1 C14.2 C15.2 C16.1 C17.1 C18.1 C19.1 C20.2 C21.2 C22.1 C23.1 C24.1 C25.1 C26.1 C27.1 C28.2 C29.1 C30.1 C31.1 C32.1 C33.1 C34.1 C35.1 C36.1 C37.1 C38.2 C40.1 H1.5 H1.6 H1.12 H1.13 H1.17 H1.20 H2.2 LED1.2 LED2.2 R1.1 R2.2 R7.2 R9.1 R11.1 R13.1 R19.1 R20.1 SW1.4 SW2.4 SW3.4 SW4.4 U1.74 U1.82 U1.89 U2.2 U3.2 U4.2 U5.2 U6.9 U6.19 U7.4 U7.9 USB1.4 USB1.5 USB1.6 USB1.7 USB3.13 USB3.14 USB3.A1B12 USB3.B1A12 X1.2 X1.4 | length 2862.6
  Top Layer w8: C12.1 447.44,835 v1(475,835) ; v1(510,665.37) 535.23,665.37 551.85,681.99 625.45,681.99 C34.1 ; v1(510,725) 558.67,725 ; v1(527.17,615) C36.1 C22.1 C23.1 v1(580,490) ; C38.2 560,723.67 558.67,725 ; C25.1 618.68,736.24 590.19,736.24 578.95,725 558.67,725 ; U1.74 929.68,778.56 v2(984.8,723.44) ; v1(820,370) 862.56,370 C32.1 ; C37.1 1375,540 v1(1405,570) ; C35.1 1372.56,602.44 v1(1405,570) ; v1(1455,482.98) R13.1 1454.37,520.63 v1(1405,570) ; C7.1 1735.27,1000.46 v1(1752.66,1017.84) ; C6.2 1752.66,977.32 v1(1752.66,977.94) ; C9.1 1731.93,670.01 v1(1760,670.01) ; C4.2 1716.94,745 v1(1760,745) ; C5.2 1737.65,438.52 v1(1775,438.52) ; C8.1 1733.51,510 v1(1775,510) ; v1(1752.66,933.3) 1790.09,933.3 U4.2 ; v1(1760,710) 1798.48,710 U3.2 ; v1(1775,475) 1786.32,475 1794.34,466.98 1806.5,466.98 U2.2 ; R20.1 1915,1630.63 v1(1915,1555) 1915,1485.63 R19.1
  Top Layer w10: U1.82 913.93,652.57 v2(984.8,723.44) ; C10.2 v1(870,1130) 890,1130 v1(920,1160) v1(974.08,1160) v1(1025,1160) 1055,1130 v1(1055,1120) ; v1(920,1725) 942.44,1725 C31.1 ; X1.2 1043.31,1108.31 v1(1055,1120) ; v1(1050,1060) 1085,1095 v1(1085,1100) 1065,1120 v1(1055,1120) ; v1(1140,1100) 1140,1067.56 C30.1 ; LED2.2 v1(1224.95,1109.31) ; v1(1304.45,1109.31) 1305,1108.76 LED1.2 ; C24.1 1390,742.56 v1(1390,735) ; U6.19@1429.49,1437.13 v1(1472.79,1437.13) ; U6.19@1472.79,1393.82 v1(1472.79,1437.13) ; U6.19@1472.79,1480.44 v1(1472.79,1437.13) ; U6.19@1516.1,1437.13 v1(1472.79,1437.13) ; USB3.A1B12 2076.49,1396.38 USB3.13@2098.15,1374.73 ; USB3.B1A12 2076.49,1693.62 USB3.14@2098.15,1715.27
  Top Layer w25: v1(583.57,875) C33.1 ; v1(590.21,810) C26.1
  other v1: 2115,280 2073.4,362.24 1075,375 1170,380 2155,430 2099.89,438.3 1360,605 2120,625 1525,630 2165,665 2093.01,698.3 2065,810 2195,825 2079.43,953.3 520,960 940,1000.98 1429.49,1393.82 1516.1,1393.82 700.63,1405.63 740,1405.63 779.37,1405.63 700.63,1445 740,1445 779.37,1445 1429.49,1480.44 1516.1,1480.44 700.63,1484.37 740,1484.37 779.37,1484.37
  other v2: 895,620 990,620 1085,620 895.75,723.44 1085,725 895,820 984.8,820 1085,820
HOSCI: C11.1 U1.51 X1.1 | length 181.7
  Top Layer w6: X1.1 1022.72,1007.44 C11.1 1085,995 1055.67,965.67 U1.51
HOSCO: C10.1 U1.52 X1.3 | length 344.7
  Top Layer w6: X1.3 940.87,1108.31 C10.1 900,1007.44 900,998.95 918.95,980 1015,980 1039.92,955.08 U1.52
KEY_USER: C19.2 R21.2 SW4.1 U1.46 | length 1073.7
  Top Layer w6: R21.2 579.62,1040 v2(615,1040) ; U1.46 1135,920.87 v2(1135,955)
  Top Layer w10: SW4.1 370,799.09 370,910 422.44,962.44 C19.2 458.74,1011.3 497.86,1011.3 498.63,1012.07 549.87,1012.07 R21.2
  Bottom Layer w6: v2(615,1040) 700,955 v2(1135,955)
LED_ERR: LED2.1 U1.44 | length 122.8
  Top Layer w8: U1.44 1225,932.13 LED2.1
LED_RUN: LED1.1 U1.43 | length 201.8
  Top Layer w8: U1.43 1233.05,873.05 1305,945 LED1.1
LINUX_UART_RX: H1.2 U1.49 | length 983.3
  Top Layer w6: v2(1080,885) 1087.16,892.16 U1.49
  Bottom Layer w6: H1.2 510,225 620,335 695,335 940,580 940,745 v2(1080,885)
LINUX_UART_TX: H1.4 U1.48 | length 954.3
  Top Layer w6: U1.48 1102.91,903.65 1110,896.56 v2(1110,880)
  Bottom Layer w6: H1.4 610,295 635,320 710,320 960,570 960,730 v2(1110,880)
LX1: L3.1 U2.3 | length 95.7
  Top Layer w20: L3.1@1744.12,368.3 1772.57,368.3 U2.3
LX2: L2.1 U3.3 | length 105.7
  Top Layer w20: L2.1@1724.12,613.3 1762.57,613.3 U3.3
LX3: L1.1 U4.3 | length 102.8
  Top Layer w20: L1.1@1719.12,853.3 1747.57,853.3 U4.3
RESET: C12.2 R8.2 SW1.1 U1.70 | length 802
  Top Layer w8: SW1.1 370,624.09 370,714.37 434.97,779.34 390.75,823.56 390.75,885.75 407.56,902.56 C12.2 457.44,902.56 518.45,841.55 U1.70
SPI0_CS: U1.60 U7.1 | length 586.1
  Top Layer w6: U7.1 898.77,1283.77 760,1145 760,1065 859.95,965.05 885.82,965.05 911.11,939.76 911.11,923.1 U1.60
SPI0_MISO: U1.61 U7.2 | length 640.8
  Top Layer w6: U1.61 898.19,936.93 880.08,955.04 855.01,954.99 745.95,1064.05 745.95,1150.95 864.24,1269.24 864.24,1385.47 U7.2
SPI0_MOSI: U1.62 U7.5 | length 776.8
  Top Layer w6: U7.5 540,1478.77 540,1310 715,1135 715,1075 844.98,945.02 875.94,945.02 882.44,938.51 U1.62
SPI0_SCK: U1.59 U7.6 | length 706.7
  Top Layer w6: U7.6 581.23,1468.77 v2(620,1430) ; v2(810,1095) 810,1035 869.93,975.07 891.54,975.07 929.68,936.93 U1.59
  Bottom Layer w6: v2(620,1430) 620,1320.68 808.7,1131.98 808.7,1096.3 v2(810,1095)
SVREF: C16.2 R12.1 R13.2 U1.33 | length 381.6
  Top Layer w8: U1.33 1290.06,715.57 R12.1 1365.63,640 1450,640 ; R13.2 1450,604.37 1450,640 ; C16.2 1472.44,662.44 1450,640
TV_VRN: C38.1 U1.75 | length 219.8
  Top Layer w10: v2(740,762.81) U1.75
  Bottom Layer w10: v2(575,762.81) 579.83,757.97 740,757.97 v2(740,762.81)
TV_VRP: C28.1 U1.76 | length 275.6
  Top Layer w10: C28.1 570,652.56 v2(570,660) ; v2(740,730) 751.43,730 767.66,746.23 787.12,746.23 U1.76
  Bottom Layer w10: v2(570,660) 670,660 v2(740,730)
UART1_RX: H1.1 U1.9 | length 732.7
  Top Layer w6: H1.1 515,120 565,170 640,170 655,185 655,285 705,335 873.73,335 945.43,406.7 U1.9
UART1_TX: H1.3 U1.10 | length 644.3
  Top Layer w6: H1.3 630,120 675,165 720,165 762.5,207.5 762.5,290 792.5,320 885,320 961.18,396.18 U1.10
UART2_RX: H1.11 U1.21 | length 458.1
  Top Layer w6: H1.11 1055,165 1055,310 1116.54,371.54 1116.54,460.27 1134.24,477.97 1134.24,526.42 U1.21
UART2_TX: H1.9 U1.19 | length 495.3
  Top Layer w6: H1.9 965,175 965,295 1020,350 1020,435 1065,480 1080,480 1102.91,502.91 U1.19
USB-5V: C14.1 C15.1 R10.2 U5.1 USB1.1 | length 433.1
  Top Layer w15: C15.1 C14.1 195,1392.44 195,1410.38 ; USB1.1 240.4,1470.4 195,1425 195,1410.38 ; R10.2 376.05,1355.42 U5.1 322.4,1395 307.02,1410.38 195,1410.38
USB-DM: U1.68 USB1.2 | length 854.1
  Top Layer w6: v2(478.98,1385) 478.98,1331.02 680,1130 680,985.8 745,920.8 745,886.5 758.45,873.05 U1.68
  Bottom Layer w6: USB1.2 319.47,1470.4 391.03,1398.84 465.14,1398.84 v2(478.98,1385)
USB-DP: U1.69 USB1.3 | length 853.1
  Top Layer w6: v2(458.06,1419.84) 456,1417.77 456,1370.73 ccw(c458.89,1370.73) 458.89,1367.84 cw(c458.89,1364.95) 461.78,1364.95 461.78,1350.73 cw(c458.89,1350.73) 458.89,1347.84 ccw(c458.89,1344.95) 456,1344.95 456,1334.2 666,1124.2 666,980 731,915 731,880.7 752.66,859.05 786.2,859.05 U1.69
  Bottom Layer w6: USB1.3 372.5,1437.17 389.84,1419.84 v2(458.06,1419.84)
USB-EN: R9.2 U1.13 U5.4 | length 1779
  Top Layer w6: R9.2 214.37,1170 v1(230,1170) ; U1.13 1008.42,496.58 1012.31,492.69 v1@1012.31,490.71
  Top Layer w10: R9.2 209.37,1205 240,1205 247.07,1212.07 247.07,1264.05 U5.4
  Bottom Layer w6: v1(230,1170) 340,1170 435,1075 645,1075 695,1025 1125,1025 1185,965 1185,865 1013.66,693.66 v1(1013.66,492.85)
VRA1: C22.2 U1.81 | length 167.5
  Top Layer w8: C22.2 682.56,567.42 750,634.86 750,648.42 769.9,668.32 U1.81
VRA2: C23.2 U1.83 | length 201.1
  Top Layer w8: C23.2 682.56,492.56 740,550 740,606.93 769.9,636.83 U1.83
WIFI-BOOT: C18.2 R14.2 SW3.1 U6.8 | length 936.6
  Top Layer w8: R14.2 509.37,1130 v2(530,1130) ; v2(780.99,1130) 840.99,1190 957.92,1190 1006.37,1238.45 1061.12,1238.45 U6.8
  Top Layer w10: SW3.1 347.68,922.68 370,945 370,987.56 C18.2 422.44,1043.07 R14.2
  Bottom Layer w8: v2(530,1130) v2(780.99,1130)
WIFI-RESET: C17.2 R16.2 SW2.1 U1.25 U6.2 | length 2435.9
  Top Layer w6: R16.2 470.63,629.37 v2(485,615) ; v2(835,565) 1140,565 1150.09,575.09 1150.53,575.09 1162.18,586.75 1178.82,586.75 U1.25 v1(1225,589.58) ; U6.2 1092.68,1620 v1(1160,1620)
  Top Layer w8: SW2.1 369.34,448.44 369.34,475.65 ; C17.2 428.09,475.65 369.34,475.65 ; R16.2 369.34,558.71 369.34,475.65
  Bottom Layer w6: v2(485,615) 535,565 v2(835,565) ; v1(1160,1620) 1220,1620 1355,1485 1355,719.58 v1(1225,589.58)
WIFI_DATA: U1.37 U6.3 | length 1170.1
  Top Layer w6: U6.3 1146.89,1563.11 1485.99,1224.01 1485.99,975.99 1288.56,778.56 U1.37
WIFI_HANDSHAKE: U1.38 U6.15 | length 1041.2
  Top Layer w6: U1.38 1284.31,794.31 1465,975 v2(1465,1205) ; v2(1720,1485) 1730,1495 1770.43,1495 U6.15
  Bottom Layer w6: v2(1465,1205) 1465,1230 v2(1720,1485)
WIFI_SPI_CS: U1.42 U6.10 | length 858.8
  Top Layer w6: U1.42 1262.3,857.3 1383.02,978.02 v2(1383.02,1175) ; v2(1670,1200) 1678.78,1208.78 U6.10
  Bottom Layer w6: v2(1383.02,1175) 1645,1175 v2(1670,1200)
WIFI_SPI_MISO: U1.39 U6.16 | length 1085.5
  Top Layer w6: U1.39 1280.05,810.05 1440,970 v2(1440,1230) ; v2(1695,1525) 1733.11,1563.11 U6.16
  Bottom Layer w6: v2(1440,1230) 1695,1485 v2(1695,1525)
WIFI_SPI_MOSI: U1.41 U6.6 | length 903.9
  Top Layer w6: U6.6 1234.05,1385.95 1405,1215 1405,975 1271.55,841.55 U1.41
WIFI_SPI_SCK: U1.40 U6.5 | length 975.8
  Top Layer w6: U6.5 1095.51,1440 1210,1440 1419,1231 1419,969 1275.8,825.8 U1.40
pads on no net: SW1.2 SW1.3 SW2.2 SW2.3 SW3.2 SW3.3 SW4.2 SW4.3 U1.1 U1.2 U1.3 U1.6 U1.7 U1.8 U1.14 U1.15 U1.16 U1.17 U1.18 U1.23 U1.24 U1.26 U1.27 U1.28 U1.29 U1.45 U1.47 U1.53 U1.54 U1.55 U1.56 U1.57 U1.58 U1.63 U1.64 U1.65 U1.66 U1.72 U1.77 U1.78 U1.79 U1.84 U1.85 U1.86 U1.87 U1.88 U6.4 U6.13 U6.14 U6.17 U6.18 USB3.A6 USB3.A7 USB3.A8 USB3.B6 USB3.B7 USB3.B8

## Polygon pours and split planes (outlines as drawn)
3V3 on Top Layer (solid, remove dead copper, pour order 4): 1500,1085 1500,976.09 1629,976.09 1629,1085
1.1V on Top Layer (solid, remove dead copper, pour order 6): 1525,535 1525,428.47 1649.69,428.47 1649.69,535
2V5 on Inner2 (solid, remove dead copper): 1615,800 1615,640 1487.04,512.04 1292.96,512.04 1284.63,510.84 1154.09,510.84 1154.09,723.4 1515.22,719.8 1512.54,800
GND on Inner2 (solid, remove dead copper): -125,2130 -125,-50 2445,-50 2445,2130
1.1V on Inner2 (solid, remove dead copper): 1525,535 1525,428.47 1649.69,428.47 1649.69,535
2V5 on Top Layer (solid, remove dead copper, pour order 2): 1510,810 1510,725 1615,725 1615,810
3V3 on Inner2 (solid, remove dead copper): 540,1640 540,61.04 1668.82,61.04 1668.82,1640
GND on Bottom Layer (solid, remove dead copper, pour order 18): -330,2110 -330,-135 2755,-135 2755,2110
GND on Top Layer (solid, remove dead copper, pour order 8): -235,2045 -235,-135 2700,-135 2700,2045

## Keep-outs
Board Outline Layer:
  region: 153.9,1885 cw(c85,1885) 16.1,1885 cw(c85,1885)
  circle w0.1: c85,1885 r68.9
  region: 153.9,1885 153.52,1877.8 152.39,1870.68 150.53,1863.71 147.94,1856.98 144.67,1850.55 140.74,1844.5 136.2,1838.9 131.1,1833.8 125.5,1829.26 119.45,1825.33 113.02,1822.06 106.29,1819.47 99.32,1817.61 92.2,1816.48 85,1816.1 77.8,1816.48 70.68,1817.61 63.71,1819.47 56.98,1822.06 50.55,1825.33 44.5,1829.26 38.9,1833.8 33.8,1838.9 29.26,1844.5 25.33,1850.55 22.06,1856.98 19.47,1863.71 17.61,1870.68 16.48,1877.8 16.1,1885 16.48,1892.2 17.61,1899.32 19.47,1906.29 22.06,1913.02 25.33,1919.45 29.26,1925.5 33.8,1931.1 38.9,1936.2 44.5,1940.74 50.55,1944.67 56.98,1947.94 63.71,1950.53 70.68,1952.39 77.8,1953.52 85,1953.9 92.2,1953.52 99.32,1952.39 106.29,1950.53 113.02,1947.94 119.45,1944.67 125.5,1940.74 131.1,1936.2 136.2,1931.1 140.74,1925.5 144.67,1919.45 147.94,1913.02 150.53,1906.29 152.39,1899.32 153.52,1892.2
  region: 2348.9,1885 cw(c2280,1885) 2211.1,1885 cw(c2280,1885)
  circle w0.1: c2280,1885 r68.9
  region: 2348.9,1885 2348.52,1877.8 2347.39,1870.68 2345.53,1863.71 2342.94,1856.98 2339.67,1850.55 2335.74,1844.5 2331.2,1838.9 2326.1,1833.8 2320.5,1829.26 2314.45,1825.33 2308.02,1822.06 2301.29,1819.47 2294.32,1817.61 2287.2,1816.48 2280,1816.1 2272.8,1816.48 2265.68,1817.61 2258.71,1819.47 2251.98,1822.06 2245.55,1825.33 2239.5,1829.26 2233.9,1833.8 2228.8,1838.9 2224.26,1844.5 2220.33,1850.55 2217.06,1856.98 2214.47,1863.71 2212.61,1870.68 2211.48,1877.8 2211.1,1885 2211.48,1892.2 2212.61,1899.32 2214.47,1906.29 2217.06,1913.02 2220.33,1919.45 2224.26,1925.5 2228.8,1931.1 2233.9,1936.2 2239.5,1940.74 2245.55,1944.67 2251.98,1947.94 2258.71,1950.53 2265.68,1952.39 2272.8,1953.52 2280,1953.9 2287.2,1953.52 2294.32,1952.39 2301.29,1950.53 2308.02,1947.94 2314.45,1944.67 2320.5,1940.74 2326.1,1936.2 2331.2,1931.1 2335.74,1925.5 2339.67,1919.45 2342.94,1913.02 2345.53,1906.29 2347.39,1899.32 2348.52,1892.2
  region: 153.9,85 cw(c85,85) 16.1,85 cw(c85,85)
  circle w0.1: c85,85 r68.9
  region: 153.9,85 153.52,77.8 152.39,70.68 150.53,63.71 147.94,56.98 144.67,50.55 140.74,44.5 136.2,38.9 131.1,33.8 125.5,29.26 119.45,25.33 113.02,22.06 106.29,19.47 99.32,17.61 92.2,16.48 85,16.1 77.8,16.48 70.68,17.61 63.71,19.47 56.98,22.06 50.55,25.33 44.5,29.26 38.9,33.8 33.8,38.9 29.26,44.5 25.33,50.55 22.06,56.98 19.47,63.71 17.61,70.68 16.48,77.8 16.1,85 16.48,92.2 17.61,99.32 19.47,106.29 22.06,113.02 25.33,119.45 29.26,125.5 33.8,131.1 38.9,136.2 44.5,140.74 50.55,144.67 56.98,147.94 63.71,150.53 70.68,152.39 77.8,153.52 85,153.9 92.2,153.52 99.32,152.39 106.29,150.53 113.02,147.94 119.45,144.67 125.5,140.74 131.1,136.2 136.2,131.1 140.74,125.5 144.67,119.45 147.94,113.02 150.53,106.29 152.39,99.32 153.52,92.2
  region: 2348.9,85 cw(c2280,85) 2211.1,85 cw(c2280,85)
  circle w0.1: c2280,85 r68.9
  region: 2348.9,85 2348.52,77.8 2347.39,70.68 2345.53,63.71 2342.94,56.98 2339.67,50.55 2335.74,44.5 2331.2,38.9 2326.1,33.8 2320.5,29.26 2314.45,25.33 2308.02,22.06 2301.29,19.47 2294.32,17.61 2287.2,16.48 2280,16.1 2272.8,16.48 2265.68,17.61 2258.71,19.47 2251.98,22.06 2245.55,25.33 2239.5,29.26 2233.9,33.8 2228.8,38.9 2224.26,44.5 2220.33,50.55 2217.06,56.98 2214.47,63.71 2212.61,70.68 2211.48,77.8 2211.1,85 2211.48,92.2 2212.61,99.32 2214.47,106.29 2217.06,113.02 2220.33,119.45 2224.26,125.5 2228.8,131.1 2233.9,136.2 2239.5,140.74 2245.55,144.67 2251.98,147.94 2258.71,150.53 2265.68,152.39 2272.8,153.52 2280,153.9 2287.2,153.52 2294.32,152.39 2301.29,150.53 2308.02,147.94 2314.45,144.67 2320.5,140.74 2326.1,136.2 2331.2,131.1 2335.74,125.5 2339.67,119.45 2342.94,113.02 2345.53,106.29 2347.39,99.32 2348.52,92.2
  lines w10: 0,0 2365,0 2365,1970 1779.33,1970 1779.33,1725.67 1085.67,1725.67 1085.67,1974.33 1085,1975 0,1975 0,0

## Silkscreen, mask and mechanical layers (free items; w line width, h text height)
Mechanical Layer:
  circle w0.1: c85,1885 r68.9
  circle w0.1: c2280,1885 r68.9
  circle w0.1: c85,85 r68.9
  circle w0.1: c2280,85 r68.9

## Dimensions
2840,1970 to 2840,0 on Document Layer
0,-276.37 to 2365,-276.37 on Document Layer

## Text inside footprints (layer, text, board x,y; h text height)
U6: Top Silkscreen Layer "ANTENNA" at 1179.09,1803.27 h80